# Altium PCB Main_PCB.PcbDoc (part 1 of 2)
Units mil, origin at the board's own origin, x right, y up, seen from the top; angles counter-clockwise.
Board outline 2401.57 x 1732.28 mil, 2 copper layers (Top Layer, Bottom Layer), stack 57 mil thick; 86 components, 54 nets, 243 pads, 73 vias.
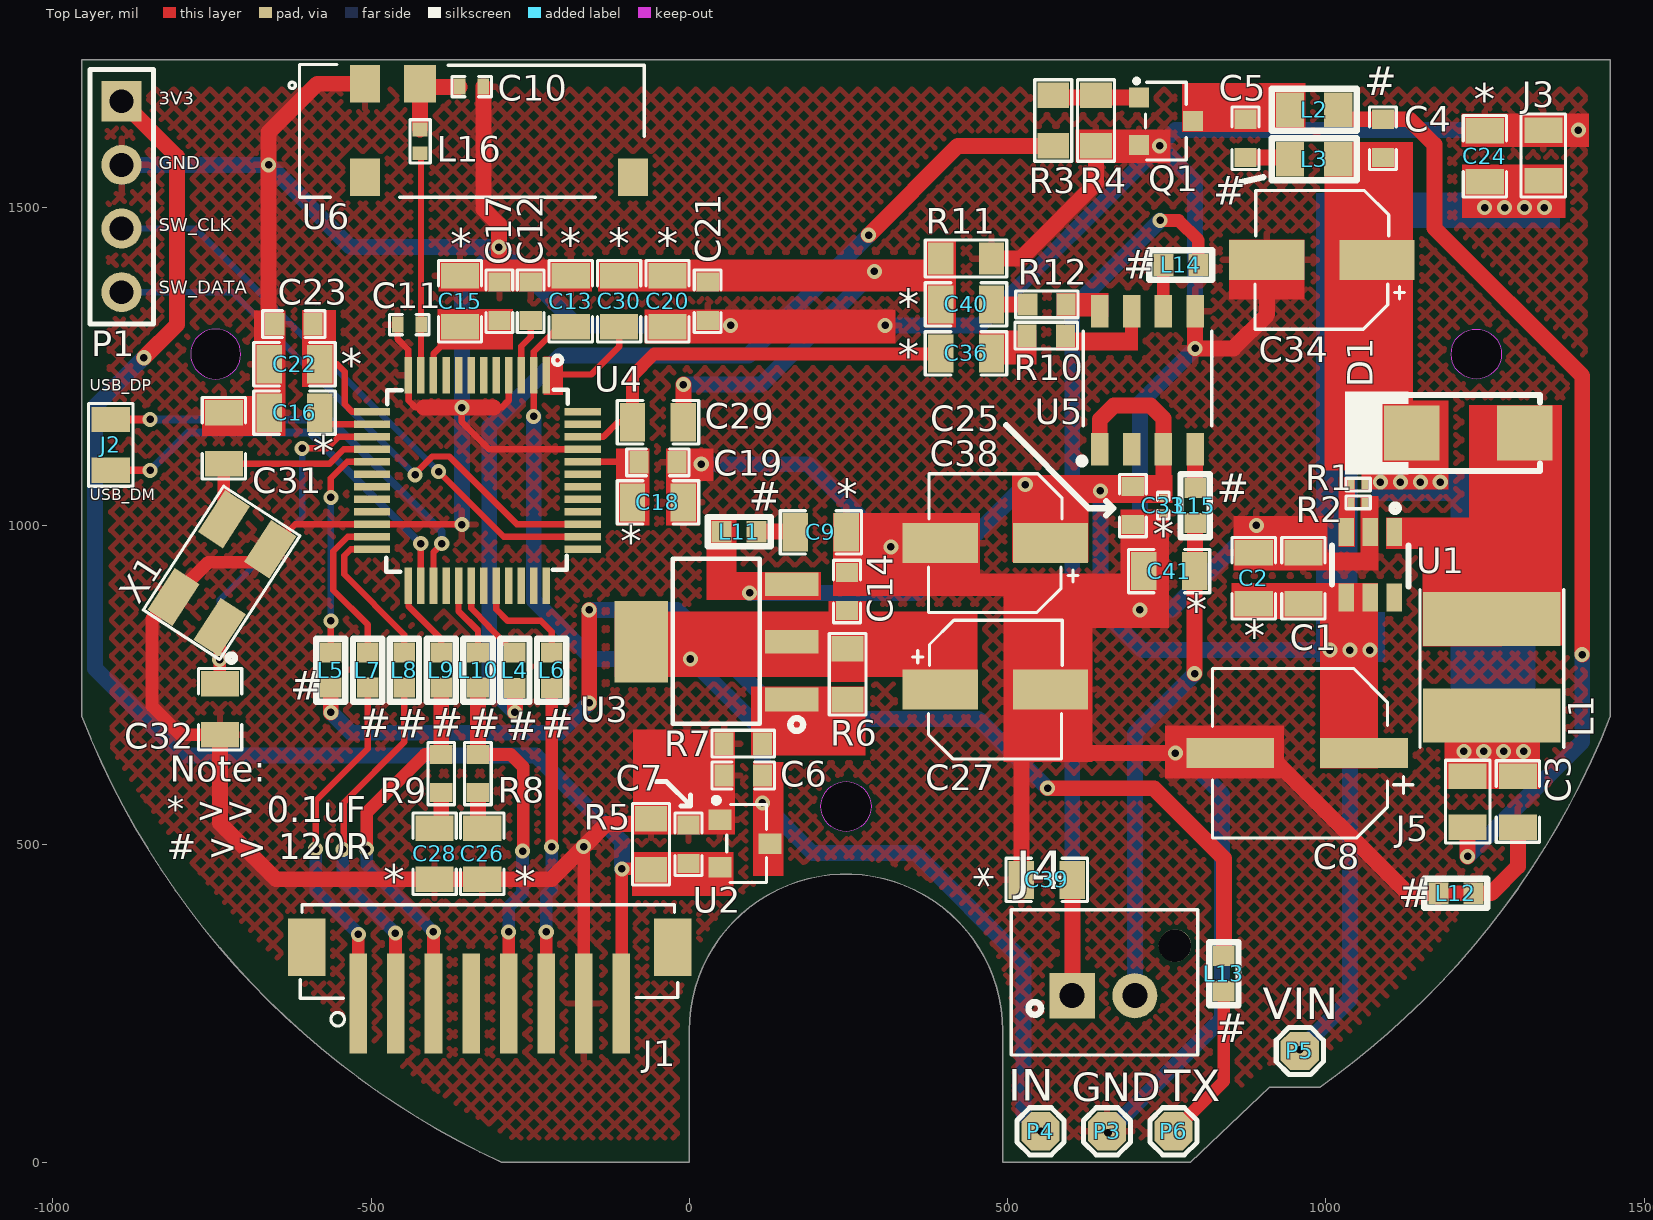
[diagram p0: Top Layer view]
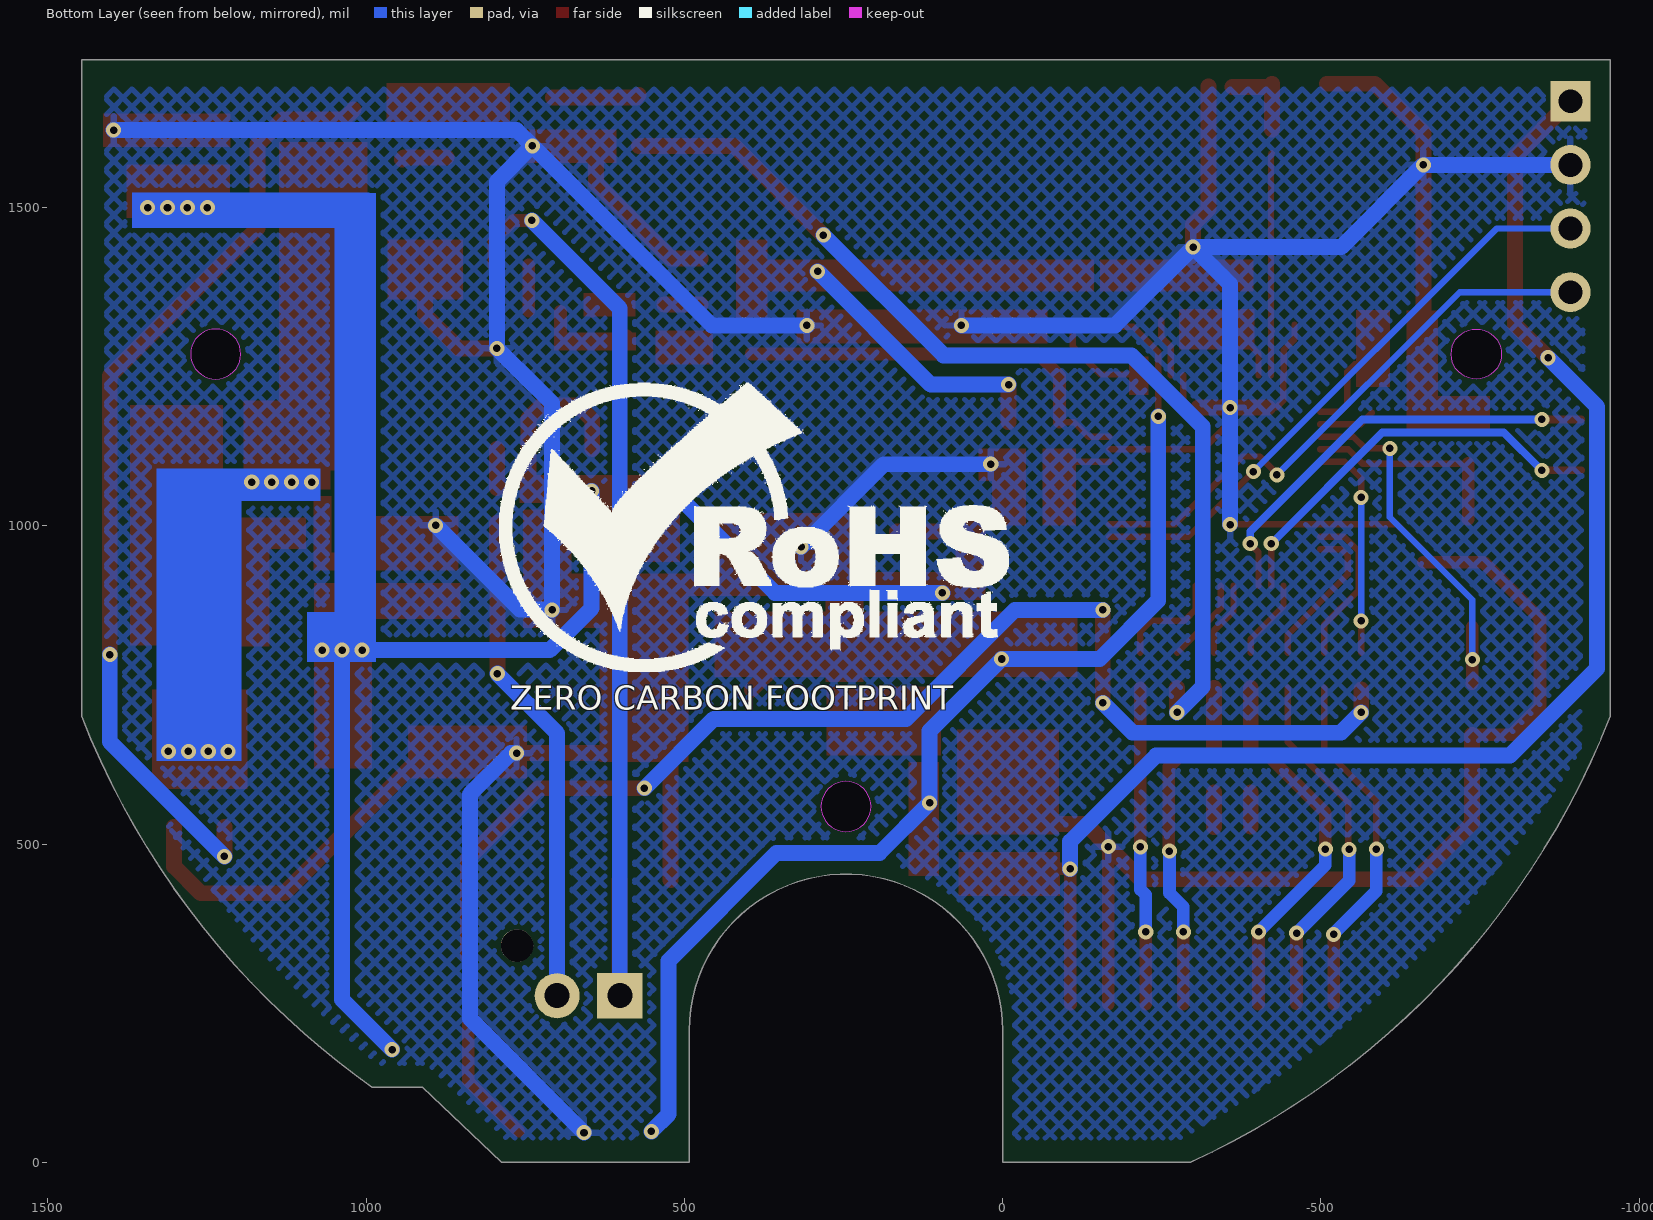
[diagram p1: Bottom Layer view, seen from below]
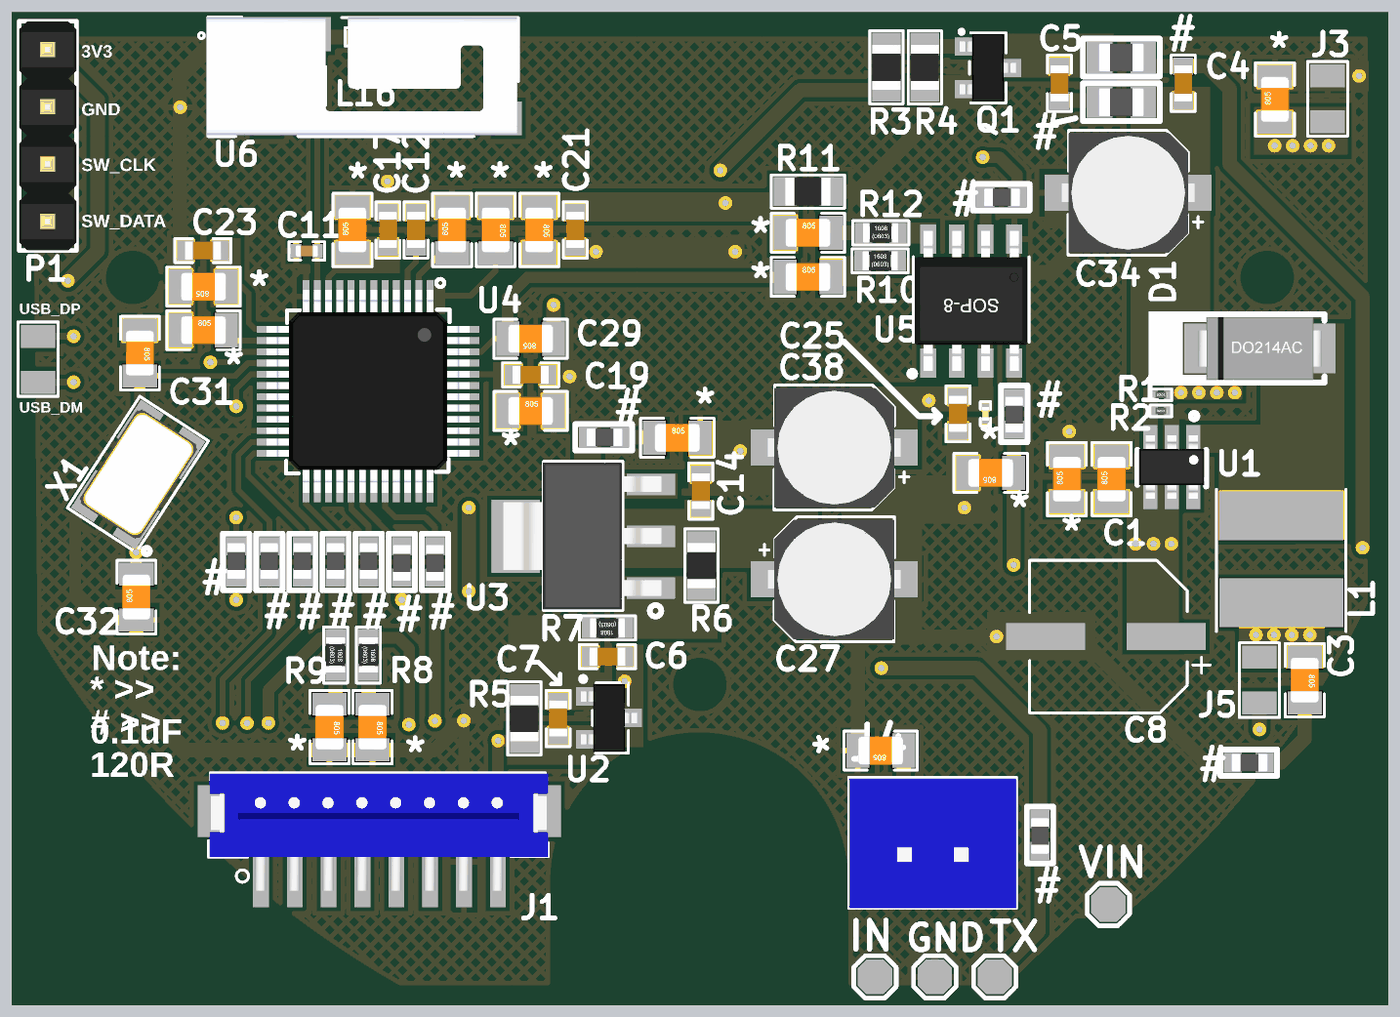
[diagram p2: 3D render of the assembled board from above, using the file's embedded part models]

## Layer stack, top to bottom
Top Solder: solder mask 3, Solder Resist, Dk 3.5
Top Layer: signal copper 10
Dielectric 1: dielectric 37, FR-4, Dk 4.8
Bottom Layer: signal copper 10
Bottom Solder: solder mask 3, Solder Resist, Dk 3.5

## Board outline
1446.85,1732.28 1446.85,700.79 cw(c246.06,1170.45) 1382.68,561.71 cw(c251.62,1167.48) 1096.64,201.97 cw(c236.68,1181.16) 990.52,118.11 911.78,118.11 787.4,0 492.13,0 492.13,206.69 ccw(c246.06,206.69) 0,206.69 0,0 -295.28,0 cw(c245.11,1168.89) -784.46,395.39 cw(c246.06,1170.08) -954.72,700.79 -954.72,1732.28
cut-out: -704.72,1269.69 ccw(c-744.09,1269.69) -744.09,1309.06 ccw(c-744.09,1269.69) -783.46,1269.69 ccw(c-744.09,1269.69) -744.09,1230.31 ccw(c-744.09,1269.69)
cut-out: 246.06,598.43 cw(c246.06,559.06) 285.43,559.06 cw(c246.06,559.06) 246.06,519.69 cw(c246.06,559.06) 206.69,559.06 cw(c246.06,559.06)
cut-out: 1236.22,1309.06 cw(c1236.22,1269.69) 1275.59,1269.69 cw(c1236.22,1269.69) 1236.22,1230.31 cw(c1236.22,1269.69) 1196.85,1269.69 cw(c1236.22,1269.69)

## Design rules (kind name [scope] priority, off if disabled: settings)
Clearance [All] p1: gap=7 ignorepadtopadclearanceinfootprint=FALSE except(0: Arc-Hole Track-Hole SMDPad-Hole THPad-Hole Via-Hole Fill-Hole Poly-Hole Region-Hole Text-Hole)
ComponentClearance [All] p1: gap=0 collisioncheckmode=3 verticalgap=0 showdistances=FALSE
HoleToHoleClearance [All] p1: gap=0 allowstackedmicrovias=TRUE
MinimumSolderMaskSliver [All] p1: minsoldermaskwidth=0
PolygonConnect [All] p1: connectstyle=Relief reliefconductorwidth=10 reliefentries=4 polygonreliefangle="90 Angle" airgapwidth=10
RoutingVias [All] p1: holewidth=11.81 width=23.62 viastyle="Through Hole" minholewidth=7.87 minwidth=17.72 maxholewidth=11.81 maxwidth=23.62
SilkToSilkClearance [All] p1: silktosilkclearance=0
SilkToSolderMaskClearance [IsPad] p1: minsilkscreentomaskgap=0 clearancetoexposedcopper=TRUE
SolderMaskExpansion SolderMaskExpansion_1 [IsVia] p1: expansion=4 istentingtop=FALSE soldermaskfromhole=TRUE
SolderMaskExpansion [Not IsVia] p2: expansion=4 istentingtop=FALSE
Width [All] p1: maxlimit=100 minlimit=10 preferedwidth=10 minimp=50.000000 maximp=50.000000 favimp=50.000000
25 further rules are at their usual default settings.

## Classes and differential pairs
component class U_MCU_Section: C10 C11 C12 C13 C14 C15 C16 C17 C18 C19 C20 C21 C22 C23 C26 C28 C29 C30 C31 C32 L5 L6 L7 L8 L9 L10 L16 R8 R9 U4 U6 X1
component class U_Connector_Section: C9 C24 J1 J2 J3 L11 L12 L13 P1 P3 P4 P5 P6
component class U_Amplifier_Section: C33 C36 C38 C39 C40 C41 J4 L14 L15 R10 R11 R12 U5
component class U_LED_Power_Sheet: C1 C2 C3 C4 C5 C8 C34 D1 J5 L1 L2 L3 L4 Q1 R1 R2 R3 R4 U1
component class U_MCU_Power_Sheet: C6 C7 C25 C27 R5 R6 R7 U2 U3

## Components (designator, comment, footprint, x,y, rotation, side; value= is the part's Value field where it differs from the comment)
C1 "22uF" Cap0805 964.66,917.72 r90 top locked
C2 "0.1uF" Cap0805 886.66,917.72 r90 top locked
C3 "22uF" Cap0805 1301.66,566.72 r270 top
C4 "1uF" Cap0603 1089.66,1608.72 r90 top
C5 "1uF" Cap0603 873.66,1608.72 r90 top
C6 "1uF" Cap0603 84.66,607.72 r180 top
C7 "1uF" Cap0603 -1.34,499.72 r90 top
C8 "220uF" RVT1C221M0607 954.66,642.72 r180 top locked value=Custom
C9 "0.1uF" Cap0805 206.66,989.72 r0 top
C10 "2.7pF" Cap0402 -342,1690 r0 top
C11 "4.7pF" Cap0402 -440,1316 r180 top
C12 "1uF" Cap0603 -249.34,1352.72 r270 top locked
C13 "0.1uF" Cap0805 -186.34,1352.72 r90 top locked
C14 "10uF" Cap0603 247.66,896.72 r90 top
C15 "0.1uF" Cap0805 -360.34,1352.72 r90 top locked
C16 "0.1uF" Cap0805 -620.34,1177.72 r0 top locked
C17 "10uF" Cap0603 -298.34,1352.72 r90 top locked
C18 "0.1uF" Cap0805 -49.34,1036.72 r0 top locked
C19 "10uF" Cap0603 -49.34,1099.72 r0 top locked
C20 "0.1uF" Cap0805 -34.34,1352.72 r270 top locked
C21 "10uF" Cap0603 28.66,1352.72 r270 top locked
C22 "0.1uF" Cap0805 -620.34,1253.72 r180 top locked
C23 "10uF" Cap0603 -621.34,1316.72 r180 top locked
C24 "0.1uF" Cap0805 1249.66,1580.72 r90 top locked
C25 "1uF" Cap0603 696.66,1031.72 r270 top locked
C26 "0.1uF" Cap0805 -325.34,484.72 r270 top locked
C27 "100uF" RVT1A101M0505 480.66,742.72 r0 top locked
C28 "0.1uF" Cap0805 -400.34,484.72 r270 top locked
C29 "0.1uF" Cap0805 -49.34,1162.72 r180 top locked
C30 "0.1uF" Cap0805 -110.34,1352.72 r270 top locked
C31 "20pF" Cap0805 -731.34,1137.72 r270 top locked
C32 "20pF" Cap0805 -737.34,711.72 r90 top locked
C33 "0.1uF" "CAP 0201" 744.66,1031.72 r270 top locked
C34 "100uF" RVT1A101M0505 993.66,1417.72 r180 top locked
C36 "0.1uF" Cap0805 434.66,1270.72 r0 top locked
C38 "100uF" RVT1A101M0505 480.66,972.72 r180 top locked
C39 "0.1uF" Cap0805 561.66,443.72 r180 top
C40 "0.1uF" Cap0805 434.66,1347.72 r0 top locked
C41 "0.1uF" Cap0805 753.66,928.72 r180 top locked
D1 "SS14" DO-214AC 1223.66,1145.72 r0 top
J1 "B8B-ZR-SM4-TF(LF)(SN)" B8B-ZR-SM4-TF(LF)(SN) -313.4,293.71 r0 top locked
J2 "SMD PADS" "SMD PAD" -909,1127 r90 top
J3 "SMD PADS" "SMD PAD" 1341.66,1581.72 r90 top locked
J4 "B2B-XH-AM(LF)(SN)" B2B-XH-AM(LF)(SN) 650.66,261.72 r0 top locked
J5 "SMD PADS" "SMD PAD" 1222.66,566.72 r270 top
L1 "4.7uH" CD54-4R7M 1260.66,777.72 r270 top value=Custom
L2 "BLM21PG121SN1D" BLM21PG121SN1D 981.66,1653.72 r180 top locked
L3 "BLM21PG121SN1D" BLM21PG121SN1D 981.66,1575.72 r180 top locked
L4 "BLM18AG121SN1D" BLM18AG121SN1D -274.18,800.61 r270 top locked
L5 "BLM18AG121SN1D" BLM18AG121SN1D -563.34,745.61 r90 top locked
L6 "BLM18AG121SN1D" BLM18AG121SN1D -216.34,800.61 r270 top locked
L7 "BLM18AG121SN1D" BLM18AG121SN1D -505.51,745.61 r90 top locked
L8 "BLM18AG121SN1D" BLM18AG121SN1D -447.68,745.61 r90 top locked
L9 "BLM18AG121SN1D" BLM18AG121SN1D -389.84,745.61 r90 top locked
L10 "BLM18AG121SN1D" BLM18AG121SN1D -332.01,745.61 r90 top locked
L11 "BLM18AG121SN1D" BLM18AG121SN1D 50.66,990.72 r0 top
L12 "BLM18AG121SN1D" BLM18AG121SN1D 1176.54,422.72 r0 top locked
L13 "BLM18AG121SN1D" BLM18AG121SN1D 839.66,323.84 r270 top
L14 "BLM18AG121SN1D" BLM18AG121SN1D 744.54,1409.72 r0 top locked
L15 "BLM18AG121SN1D" BLM18AG121SN1D 794.66,1059.22 r270 top locked
L16 "1.6nH" "Ind 0402" -423,1604 r270 top
P1 "61300411121" HDR1X4 -892,1667 r270 top
P3 "Test Point" "TEST POINT" 656.16,48.72 r0 top
P4 "Test Point" "TEST POINT" 551.66,48.72 r0 top
P5 "Test Point" "TEST POINT" 959,175 r0 top
P6 "Test Point" "TEST POINT" 760.66,48.72 r0 top
Q1 "ST3422A" SOT23-3 748.66,1635.72 r270 top locked value=Custom
R1 "180K" Res-0201 1050.66,1064.72 r0 top locked
R2 "20K" Res-0201 1050.66,1036.72 r0 top locked
R3 "1K" "RES 0805" 571.66,1636.72 r270 top locked
R4 "10K" "RES 0805" 638.66,1636.72 r270 top locked
R5 "10K" "RES 0805" -60.34,499.72 r270 top
R6 "1K" "RES 0805" 248.66,766.72 r270 top
R7 "1.8K" Res0603 84.66,657.72 r0 top
R8 "10R" Res0603 -332.34,610.72 r90 top locked
R9 "10R" Res0603 -389.84,610.72 r90 top locked
R10 "47K" Res0603 560.66,1298.72 r180 top locked
R11 "0R" "RES 0805" 434.66,1419.72 r180 top locked
R12 "47K" Res0603 561.66,1347.72 r180 top locked
U1 "SDB628" SOT-23-6 1069.66,938.72 r270 top locked value=Custom
U2 "XC6206P332MR-G" sot-23 87.29,500.72 r270 top
U3 "LM1117MPX-ADJ/NOPB" SOT-223 42.66,817.72 r90 top
U4 "BP1048B2" "48 LQFP" -333.11,1071.15 r270 top locked
U5 "HT8693" SOP-8 719.66,1228.72 r90 top locked
U6 "PRO-OB-440" PRO-OB-440 -299,1621 r90 top locked
X1 "24MHz" 7I24000F20UCG -734.34,925.72 r57 top locked

## Footprints (in the part's own frame and the unit in brackets; to place one, negate y for a bottom-side part, rotate by r counter-clockwise, add the part's x,y. Pads: shape width x height; smd on the part's side, far side on the other; paste and mask are expansions set on the pad)
7I24000F20UCG [mm] "24MHz ±20ppm 20pF 40O SMD-5032_4P Crystals RoHS"
  rect 2x1.2 smd: 1(-1.85,-1.1) 2(1.85,-1.1) 3(1.85,1.1) 4(-1.85,1.1)
  silkscreen extent -2.95,-2.3 2.95,1.83, body extent -2.47,-1.6 2.53,1.6, height 1
"48 LQFP" [mm] "7mm x 7mm x 1.4mm, 0.5mm pitch"
  rect 1.45x0.3 smd: 1(-4.202,2.75) 2(-4.202,2.25) 3(-4.202,1.75) 4(-4.202,1.25) 5(-4.202,0.75) 6(-4.202,0.25) 7(-4.202,-0.25) 8(-4.202,-0.75) 9(-4.202,-1.25) 10(-4.202,-1.75) 11(-4.202,-2.25) 12(-4.202,-2.75) 25(4.202,-2.749) 26(4.202,-2.25) 27(4.202,-1.75) 28(4.202,-1.25) 29(4.202,-0.75) 30(4.202,-0.25) 31(4.202,0.25) 32(4.202,0.75) 33(4.202,1.25) 34(4.202,1.75) 35(4.202,2.25) 36(4.202,2.75)
  rect 0.3x1.45 smd: 13(-2.75,-4.202) 14(-2.25,-4.202) 15(-1.75,-4.202) 16(-1.25,-4.202) 17(-0.75,-4.202) 18(-0.25,-4.202) 19(0.25,-4.202) 20(0.75,-4.202) 21(1.25,-4.202) 22(1.75,-4.202) 23(2.25,-4.202) 24(2.75,-4.202) 37(2.75,4.202) 38(2.25,4.202) 39(1.75,4.202) 40(1.25,4.202) 41(0.75,4.202) 42(0.25,4.202) 43(-0.25,4.202) 44(-0.75,4.202) 45(-1.25,4.202) 46(-1.75,4.202) 47(-2.25,4.202) 48(-2.75,4.202)
  silkscreen extent -4.98,-3.64 3.65,3.61, body extent -4.5,-4.5 4.5,4.5, height 1.5
B2B-XH-AM(LF)(SN) [mm] "XH Header Male Pin 0.098\"(2.50mm) 2 Through Hole,P=2.5mm Wire To Board / Wire To Wire Connector RoHS"
  rect 1.8x1.8 hole 1: 1(-1.25,0)
  round 1.8 hole 1: 2(1.25,0)
  round 1.295 hole 1.295 unplated: 3(2.85,2)
  silkscreen extent -3.68,-2.36 3.76,3.43, body extent -3.65,-2.37 3.75,3.38, height 7
B8B-ZR-SM4-TF(LF)(SN) [mm] "ZH Header Male Pin 0.059\"(1.50mm) 8 SMD,P=1.5mm Wire To Board / Wire To Wire Connector RoHS"
  rect 0.7x4 smd: 1(-5.25,-1.125) 2(-3.75,-1.125) 3(-2.25,-1.125) 4(-0.75,-1.125) 5(0.75,-1.125) 6(2.25,-1.125) 7(3.75,-1.125) 8(5.25,-1.125)
  rect 1.5x2.3 smd: MP1(7.3,1.125) MP2(-7.3,1.125)
  silkscreen extent -7.57,-2.02 7.49,2.82, body extent -7.53,-2.41 7.47,2.79, height 5
BLM18AG121SN1D [mm] "120O @ 100MHz 500mA 1 180mO 0603 Ferrite Beads RoHS"
  rect 0.8x0.864 smd: 1(0,0) 2(1.4,0)
  silkscreen extent -0.56,-0.58 1.96,0.58, body extent -0.06,-0.4 1.54,0.4, height 0.95
BLM21PG121SN1D [mil] "120O @ 100MHz 3A 1 30mO 0805 Ferrite Beads RoHS"
  rect 44.61x54.21 smd: 1(-38.03,0) 2(38.03,0)
  silkscreen extent -67,-33 67,33, body extent -39,-25 39,25, height 41
Cap0402 [mil]
  rect 18x25 smd mask+2.36: 1(-18.5,0) 2(18.5,0)
  silkscreen extent -31,-16 31,16, body extent -20,-10 20,10, height 19
Cap0603 [mil]
  rect 30x35 smd mask+2.36: 1(-30,0) 2(30,0)
  silkscreen extent -49,-21 49,21, body extent -32,-16 31,16, height 34
Cap0805 [mil] "SMD 0805"
  rect 40x60 smd mask+2.76: 1(-40,0) 2(40,0)
  silkscreen extent -64,-34 64,34, body extent -39,-25 39,25, height 30
"CAP 0201" [mm]
  rect 0.3x0.3 smd mask+0.055: 1(-0.3,0) 2(0.3,0)
  silkscreen extent -0.53,-0.23 0.53,0.23, body extent -0.3,-0.15 0.3,0.15, height 0.28
CD54-4R7M [mm]
  rect 2.15x5.5 smd mask+0.055: 1(-1.925,0) 2(1.925,0)
  silkscreen extent -3.1,-2.87 3.2,2.87
DO-214AC [mm]
  rect 2.21x2.2 smd: 1(2.25,0) 2(-2.25,0)
  silkscreen extent -4.93,-1.65 2.86,1.65, body extent -2.74,-1.4 2.74,1.4, height 2.24
HDR1X4 [mm] "Connector; Header; 4 Position"
  rect 1.6x1.6 hole 0.95: 1(0,0)
  round 1.6 hole 0.95: 2(2.54,0) 3(5.08,0) 4(7.62,0)
  silkscreen extent -1.27,-1.27 8.89,1.27, body extent -1.27,-1.27 8.89,1.27, height 9.5
"Ind 0402" [mm]
  rect 0.55x0.6 smd: 1(-0.475,0) 2(0.475,0)
  silkscreen extent -0.86,-0.41 0.86,0.41, body extent -0.5,-0.28 0.5,0.27, height 0.48
PRO-OB-440 [mm] "RF ANT 2.4GHZ STAMPED MET SLD"
  rect 1.5x1.2 smd: 1(1.865,5.35) 3(-1.865,5.35) 4(-1.865,-5.35)
  rect 1.5x1.28 smd: 2(1.865,3.15)
  silkscreen extent -2.67,-5.79 2.63,8.38, body extent -2.62,-5.74 2.62,8.01, height 3.5
Res0603 [mil]
  rect 30x35 smd: 1(-30,0) 2(30,0)
  silkscreen extent -49,-21 49,21, body extent -31,-17 31,17, height 18
"RES 0805" [mil] "SMD 0805"
  rect 40x50 smd: 1(-40,0) 2(40,0)
  silkscreen extent -64,-29 64,29, body extent -39,-25 39,24, height 24
Res-0201 [mm]
  rect 0.27x0.37 smd: 1(-0.275,0) 2(0.275,0)
  silkscreen extent -0.48,-0.25 0.48,0.25, body extent -0.3,-0.15 0.3,0.15, height 0.29
RVT1A101M0505 [mm] "100uF ±20% 10V 5mm 5.4mm 2000hrs 105? -45?~+105? SMD,5x5.4mm Aluminum Electrolytic Capacitors - SMD RoHS"
  rect 3x1.6 smd: 1(-2.2,0) 2(2.2,0)
  silkscreen extent -3.3,-2.77 2.67,2.77, body extent -2.95,-2.65 2.95,2.65, height 5.57
RVT1C221M0607 [mm]
  rect 3.5x1.2 smd: 1(-2.67,0) 2(2.67,0)
  silkscreen extent -4.62,-3.38 3.38,3.38
"SMD PAD" [mil] "SMD 0805"
  rect 40x60 smd: 1(-40,0) 2(40,0)
  silkscreen extent -65,-35 65,35
SOP-8 [mm]
  rect 1.3x0.7 smd: 1(-2.75,1.905) 2(-2.75,0.635) 3(-2.75,-0.635) 4(-2.75,-1.905) 5(2.75,-1.905) 6(2.75,-0.635) 7(2.75,0.635) 8(2.75,1.905)
  silkscreen extent -3.36,-2.57 1.96,2.75, body extent -3.11,-2.5 3.11,2.5, height 1.87
SOT23-3 [mm] "SOT23, 3-Leads, Body 2.9x1.3mm, Pitch 0.95mm, Lead Span 2.3mm - Reverse Pinning, IPC High Density"
  rect 0.8x0.8 smd: 1(-0.95,-1.075) 2(0.95,-1.075) 3(0,1.075)
  silkscreen extent -1.65,-1.22 1.55,0.81, body extent -1.5,-1.25 1.5,1.25, height 1.05
sot-23 [mm]
  rect 0.82x0.92 smd: 1(-0.95,-1) 2(0.95,-1) 3(0,1)
  silkscreen extent -1.82,-1.23 1.56,0.86, body extent -1.5,-1.25 1.5,1.25, height 1.1
SOT-23-6 [mm] "IC BAT CHG LI-ION 1 CELL SOT23-6"
  rect 1.12x0.62 smd: 1(-1.3,0.95) 2(-1.3,0) 3(-1.3,-0.95) 4(1.3,-0.95) 5(1.3,0) 6(1.3,0.95)
  silkscreen extent -2.4,-1.52 0.86,1.52, body extent -1.4,-1.45 1.4,1.45, height 1.44
SOT-223 [mm] "Adjustable 18V 1.25V ~ 16.6V 1.4V @ 1A SOT-223 Linear Voltage Regulators (LDO) RoHS"
  rect 0.95x2.15 smd: 1(-2.3,-3.002) 2(0,-3.002) 3(2.3,-3.002)
  rect 3.25x2.15 smd: 4(0,3.002)
  silkscreen extent -3.56,-3.45 3.31,1.75, body extent -3.24,-3.45 3.26,3.55, height 1.54
"TEST POINT" [mil]
  oct 60x60 smd: 1(0,0)
  silkscreen extent -37,-37 37,37

## Part data
C1 C3: library part CL21A226MOQNNNE, "CAP CER 22UF 16V X5R 0805", Case Code (Imperial)=0805, Case Code (Metric)=2012, Dielectric=X5R, Manufacturer=Samsung, Max Operating Temperature=85°C, Min Operating Temperature=-55°C, Package Quantity=1, Supplier Part Number 1=1276-2909-1-ND, Tolerance=20%, Voltage Rating=16V, Capacitance=22uF, Case/Package=0805, Category="Ceramic Capacitors", ComponentLink1Description=https://datasheet.ciiva.com/25724/cl21a226moqnnne-25724832.pdf?src-supplier=Digi-Key, ComponentLink1URL=https://datasheet.ciiva.com/25724/cl21a226moqnnne-25724832.pdf?src-supplier=Digi-Key, Construction=Flat, Contact Plating=Tin, Lead Free="Lead Free", Length=0.079inch, Manufacturer Part Number=CL21A226MOQNNNE, Mount="Surface Mount", Packaging="Cut Tape", Pricing 1="1=0.30000, 10=0.20900, 50=0.13900, 100=0.11820, 500=0.08344, 1000=0.07301 (USD)", RoHS=Yes, RoHS Compliant=Yes, Series=CL, Stock 1=91301, Supplier 1=Digi-Key, Termination=Wraparound, Thickness=0.055inch, Voltage Rating (DC)=16V, Width=0.049inch
C2 C9 C13 C15 C16 C18 C20 C22 C24 C26 C28 C29 C30 C36 C39 C40 C41: library part 0805B104K500CT, "CAP CER 0.1UF 50V X7R 0805", Capacitance=100nF, Case Code (Imperial)=0805, Case Code (Metric)=2012, Dielectric=X7R, Manufacturer="Walsin Technologies", Max Operating Temperature=125°C, Min Operating Temperature=-55°C, Supplier Part Number 1=1292-1647-1-ND, Tolerance=10%, Voltage=50V, Case/Package=0805, Category="Ceramic Capacitors", ComponentLink1Description=http://www.farnell.com/datasheets/2340522.pdf?src-supplier=Farnell, ComponentLink1URL=http://www.farnell.com/datasheets/2340522.pdf?src-supplier=Farnell, ComponentLink2Description=http://components.arrow.com/part/dataview/0323_00650840?src-supplier=Arrow+Europe, ComponentLink2URL=http://components.arrow.com/part/dataview/0323_00650840?src-supplier=Arrow+Europe, ComponentLink3Description=https://www.verical.com/server-webapp/html/getDatasheet?partID=414849&src-supplier=Verical, ComponentLink3URL=https://www.verical.com/server-webapp/html/getDatasheet?partID=414849&src-supplier=Verical, ComponentLink4Description=http://www.farnell.com/datasheets/2340522.pdf?src-supplier=Element14, ComponentLink4URL=http://www.farnell.com/datasheets/2340522.pdf?src-supplier=Element14, ComponentLink5Description=http://www.passivecomponent.com/wp-content/uploads/2018/10/MLCC.pdf?src-supplier=Digi-Key, ComponentLink5URL=http://www.passivecomponent.com/wp-content/uploads/2018/10/MLCC.pdf?src-supplier=Digi-Key, ComponentLink6Description=http://www.passivecomponent.com/indexsea/0805B104K500CT-IB.pdf?src-supplier=Digi-Key, ComponentLink6URL=http://www.passivecomponent.com/indexsea/0805B104K500CT-IB.pdf?src-supplier=Digi-Key, ComponentLink7Description=http://www.farnell.com/datasheets/2340522.pdf?src-supplier=Newark, ComponentLink7URL=http://www.farnell.com/datasheets/2340522.pdf?src-supplier=Newark, Depth=1.25mm, Lead Free="Lead Free", Length=2mm, Manufacturer Part Number=0805B104K500CT, Packaging="Tape and Reel", Pricing 1="1=0.12000, 10=0.08600, 50=0.04900, 100=0.04050, 500=0.02842, 1000=0.02352 (USD)", Radiation Hardening=No, REACH SVHC=Unknown, RoHS=Yes, Stock 1=1274242, Supplier 1=Digi-Key, Voltage Rating=50V, Voltage Rating (DC)=50V
C4 C5 C6 C7 C12 C25: library part CC0603KRX5R8BB105, "CAP CER 1UF 25V X5R 0603", Case Code (Imperial)=0603, Case Code (Metric)=1608, Dielectric=X5R, Manufacturer=Yageo, Max Operating Temperature=85°C, Min Operating Temperature=-55°C, Package Quantity=1, Supplier Part Number 1=311-1445-1-ND, Tolerance=10%, Voltage Rating=25V, Capacitance=1uF, Case/Package=0603, Category="Ceramic Capacitors", ComponentLink1Description=https://datasheet.ciiva.com/176/mlccorderingcode-176785.pdf?src-supplier=Digi-Key, ComponentLink1URL=https://datasheet.ciiva.com/176/mlccorderingcode-176785.pdf?src-supplier=Digi-Key, ComponentLink2Description=https://datasheet.ciiva.com/176/mlccorderingcode-176786.pdf?src-supplier=Digi-Key, ComponentLink2URL=https://datasheet.ciiva.com/176/mlccorderingcode-176786.pdf?src-supplier=Digi-Key, ComponentLink3Description=https://datasheet.ciiva.com/176/mlccorderingcode-176787.pdf?src-supplier=Digi-Key, ComponentLink3URL=https://datasheet.ciiva.com/176/mlccorderingcode-176787.pdf?src-supplier=Digi-Key, ComponentLink4Description=https://datasheet.ciiva.com/17436/upy-gphc-x5r-4v-to-50v-12-17436952.pdf?src-supplier=Avnet+Europe, ComponentLink4URL=https://datasheet.ciiva.com/17436/upy-gphc-x5r-4v-to-50v-12-17436952.pdf?src-supplier=Avnet+Europe, ComponentLink5Description=https://datasheet.ciiva.com/7978/1525783-7978171.pdf?src-supplier=Element14, ComponentLink5URL=https://datasheet.ciiva.com/7978/1525783-7978171.pdf?src-supplier=Element14, ComponentLink6Description=https://datasheet.ciiva.com/11586/upy-gphc-x5r-4v-to-50v-12-11586318.pdf?src-supplier=Avnet, ComponentLink6URL=https://datasheet.ciiva.com/11586/upy-gphc-x5r-4v-to-50v-12-11586318.pdf?src-supplier=Avnet, Construction=Flat, Depth=0.8mm, Halogen Free="Halogen Free", Height=0.8mm, Lead Free="Lead Free", Length=1.6mm, Manufacturer Part Number=CC0603KRX5R8BB105, Mount="Surface Mount", Number of Pins=2, Packaging="Tape and Reel", Pricing 1="1=0.12000, 10=0.08400, 50=0.04760, 100=0.03940, 500=0.02764, 1000=0.02288 (USD)", Radiation Hardening=No, REACH SVHC="No SVHC", RoHS=Yes, RoHS Compliant=Yes, Series=CC, Stock 1=919939, Supplier 1=Digi-Key, Termination=SMD/SMT, Thickness=0.035inch, Voltage Rating (DC)=25V, Width=0.031inch
C8: library part RVT1C221M0607, "220uF 16V 6.3mm 7.7mm 2000hrs 105℃ -55℃~+105℃ SMD,6.3x7.7mm Aluminum Electrolytic Capacitors - SMD RoHS", Manufacturer="Honor Elec", Package=Custom, ComponentLink1Description="Supplier Link", ComponentLink1URL=https://lcsc.com/product-detail/Aluminum-Electrolytic-Capacitors-SMD_Honor-Elec-RVT1C221M0607_C3342.html, Manufacturer Part No=RVT1C221M0607
C10: library part 04023A2R7BAT2A, "CAP CER 2.7PF 25V NP0 0402", Case Code (Imperial)=0402, Case Code (Metric)=1005, Dielectric=C0G, Manufacturer="Kyocera AVX", Max Operating Temperature=125°C, Min Operating Temperature=-55°C, Package Quantity=10000, Supplier Part Number 1=478-12612-6-ND, Temperature Coefficient=0ppm/°C, Voltage Rating=25V, Capacitance=2.7pF, Case/Package=0402, ComponentLink1Description=http://datasheets.avx.com/C0GNP0-Dielectric.pdf?src-supplier=Digi-Key, ComponentLink1URL=http://datasheets.avx.com/C0GNP0-Dielectric.pdf?src-supplier=Digi-Key, ComponentLink2Description=http://www.avx.com/docs/Catalogs/ccog.pdf?src-supplier=Future+Electronics, ComponentLink2URL=http://www.avx.com/docs/Catalogs/ccog.pdf?src-supplier=Future+Electronics, ComponentLink3Description=http://www.avxcorp.com/docs/Catalogs/ccog.pdf?src-supplier=Avnet, ComponentLink3URL=http://www.avxcorp.com/docs/Catalogs/ccog.pdf?src-supplier=Avnet, Depth=0.5mm, Lead Free="Lead Free", Length=1mm, Manufacturer Part Number=04023A2R7BAT2A, Mount="Surface Mount", Packaging="Tape and Reel", Pricing 1="1=0.32, 10=0.218, 50=0.1452, 100=0.1234, 500=0.08712, 1000=0.07623, 2500=0.0726, 5000=0.06716 (USD)", Radiation Hardening=No, Stock 1=28479, Supplier 1=Digi-Key, Termination=SMD/SMT, Thickness=0.022inch, Voltage Rating (DC)=25V, Width=0.02inch
C11: library part 885012005023, "CAP CER 4.7PF 16V C0G/NP0 0402", Case Code (Imperial)=0402, Case Code (Metric)=1005, Manufacturer="Wurth Electronics", Max Operating Temperature=125°C, Min Operating Temperature=-55°C, Supplier Part Number 1=732-7439-6-ND, Voltage Rating=16V, Capacitance=4.7pF, Case/Package=0402, ComponentLink1Description=https://katalog.we-online.de/pbs/datasheet/885012005023.pdf?src-supplier=Digi-Key, ComponentLink1URL=https://katalog.we-online.de/pbs/datasheet/885012005023.pdf?src-supplier=Digi-Key, ComponentLink2Description=http://www.farnell.com/datasheets/2546554.pdf?src-supplier=Farnell, ComponentLink2URL=http://www.farnell.com/datasheets/2546554.pdf?src-supplier=Farnell, ComponentLink3Description=http://www.farnell.com/datasheets/2546554.pdf?src-supplier=Newark, ComponentLink3URL=http://www.farnell.com/datasheets/2546554.pdf?src-supplier=Newark, ComponentLink4Description=http://www.farnell.com/datasheets/2546554.pdf?src-supplier=Element14, ComponentLink4URL=http://www.farnell.com/datasheets/2546554.pdf?src-supplier=Element14, Length=0.039inch, Manufacturer Part Number=885012005023, Mount="Surface Mount", Packaging="Cut Tape", Pricing 1="1=0.1, 10=0.015, 100=0.0134, 500=0.01188 (USD)", Stock 1=8921, Supplier 1=Digi-Key, Thickness=0.022inch, Width=0.02inch
C14 C17 C19 C21 C23: library part C1608X5R1E106M080AC, "CAP CER 10UF 25V X5R 0603", Case Code (Imperial)=0603, Case Code (Metric)=1608, Dielectric=X5R, Dielectric Material=Ceramic, Manufacturer=TDK, Max Operating Temperature=85°C, Min Operating Temperature=-55°C, Package Quantity=1, Supplier Part Number 1=445-9015-1-ND, Tolerance=20%, Voltage Rating=25V, Capacitance=10uF, Case/Package=0603, Category="Ceramic Capacitors", ComponentLink1Description=http://components.arrow.com/part/dataview/0323_06887183?src-supplier=Arrow+Europe, ComponentLink1URL=http://components.arrow.com/part/dataview/0323_06887183?src-supplier=Arrow+Europe, ComponentLink2Description=http://www.farnell.com/datasheets/2792994.pdf?src-supplier=Farnell, ComponentLink2URL=http://www.farnell.com/datasheets/2792994.pdf?src-supplier=Farnell, ComponentLink3Description=http://www.farnell.com/datasheets/2291921.pdf?src-supplier=Avnet, ComponentLink3URL=http://www.farnell.com/datasheets/2291921.pdf?src-supplier=Avnet, ComponentLink4Description=http://www.farnell.com/datasheets/1470445.pdf?src-supplier=Newark, ComponentLink4URL=http://www.farnell.com/datasheets/1470445.pdf?src-supplier=Newark, ComponentLink5Description=http://www.farnell.com/datasheets/2291921.pdf?src-supplier=Newark, ComponentLink5URL=http://www.farnell.com/datasheets/2291921.pdf?src-supplier=Newark, ComponentLink6Description=http://www.farnell.com/datasheets/2792994.pdf?src-supplier=Element14, ComponentLink6URL=http://www.farnell.com/datasheets/2792994.pdf?src-supplier=Element14, ComponentLink7Description=http://www.farnell.com/datasheets/1913358.pdf?src-supplier=Element14, ComponentLink7URL=http://www.farnell.com/datasheets/1913358.pdf?src-supplier=Element14, ComponentLink8Description=https://product.tdk.com/info/en/catalog/datasheets/mlcc_commercial_general_en.pdf?src-supplier=Digi-Key, ComponentLink8URL=https://product.tdk.com/info/en/catalog/datasheets/mlcc_commercial_general_en.pdf?src-supplier=Digi-Key, ComponentLink9Description=http://www.farnell.com/datasheets/2291921.pdf?src-supplier=RSComponents, ComponentLink9URL=http://www.farnell.com/datasheets/2291921.pdf?src-supplier=RSComponents, ComponentLink10Description=http://www.farnell.com/datasheets/2291921.pdf?src-supplier=Verical, ComponentLink10URL=http://www.farnell.com/datasheets/2291921.pdf?src-supplier=Verical, ComponentLink11Description=http://www.farnell.com/datasheets/2291921.pdf?src-supplier=Mouser, ComponentLink11URL=http://www.farnell.com/datasheets/2291921.pdf?src-supplier=Mouser, ComponentLink12Description=http://www.farnell.com/datasheets/2792994.pdf?src-supplier=Newark, ComponentLink12URL=http://www.farnell.com/datasheets/2792994.pdf?src-supplier=Newark, ComponentLink13Description=http://www.farnell.com/datasheets/2291921.pdf?src-supplier=Quest, ComponentLink13URL=http://www.farnell.com/datasheets/2291921.pdf?src-supplier=Quest, ComponentLink14Description=http://www.farnell.com/datasheets/2291921.pdf?src-supplier=TTI, ComponentLink14URL=http://www.farnell.com/datasheets/2291921.pdf?src-supplier=TTI, Construction=Flat, Depth=0.8mm, Height=0.8mm, Lead Free="Lead Free", Length=1.6mm, Manufacturer Part Number=C1608X5R1E106M080AC, Mount="Surface Mount", Packaging="Tape and Reel", Pricing 1="1=0.86000, 10=0.60700, 50=0.45920, 100=0.39990, 500=0.29624, 1000=0.25180 (USD)", REACH SVHC="No SVHC", Resistor Type=Ceramic, RoHS=Yes, RoHS Compliant=Yes, Series=C, Stock 1=217631, Supplier 1=Digi-Key, Termination=SMD/SMT, Thickness=0.039inch, Voltage Rating (DC)=25V, Weight=7.1E-05oz, Width=0.8mm
C27 C34 C38: library part RVT1A101M0505, "100uF ±20% 10V 5mm 5.4mm 2000hrs 105℃ -45℃~+105℃ SMD,5x5.4mm Aluminum Electrolytic Capacitors - SMD RoHS", Manufacturer="CX(Dongguan Chengxing Elec)", Operating Temperature=-45℃~+105℃, Package=SMD,5x5.4mm, Rated Voltage=10V, Tolerance=±20%, Capacitance=100uF, L=5.4mm, φD=5mm
C31 C32: library part C0805C200J5GACTU, "CAP CER 20PF 50V C0G/NP0 0805", Case Code (Imperial)=0805, Case Code (Metric)=2012, Dielectric=C0G, Dielectric Material=Ceramic, Manufacturer=KEMET, Max Operating Temperature=125°C, Min Operating Temperature=-55°C, Package Quantity=4000, Supplier Part Number 1=399-8033-1-ND, Tolerance=5%, Voltage Rating=50V, Capacitance=20pF, Case/Package=0805, Category="Ceramic Capacitors", ComponentLink1Description=https://datasheet.ciiva.com/5414/kem-c1003-c0g-smd-356956-5414200.pdf?src-supplier=Mouser, ComponentLink1URL=https://datasheet.ciiva.com/5414/kem-c1003-c0g-smd-356956-5414200.pdf?src-supplier=Mouser, Construction=Flat, Contact Plating=Tin,Matte, Depth=1.25mm, Dissipation Factor=0.1%, Height=0.78mm, Lead Free="Lead Free", Lead Pitch=0.75mm, Length=2mm, Manufacturer Part Number=C0805C200J5GACTU, Mount="Surface Mount", Packaging="Tape and Reel", Pricing 1="1=0.30000, 10=0.20700, 50=0.13800, 100=0.11730, 500=0.08280, 1000=0.07245 (USD)", Radiation Hardening=No, REACH SVHC="No SVHC", RoHS=Yes, RoHS Compliant=Yes, Series="SMD Comm C0G", Stock 1=17196, Supplier 1=Digi-Key, Termination=SMD/SMT, Thickness=0.035inch, Voltage Rating (DC)=50V, Width=1.2mm
C33: library part GRM033R6YA104ME14D, "CAP CER 0.1UF 35V X5R 0201", Capacitance=100nF, Case Code (Imperial)=0201, Case Code (Metric)=0603, Dielectric=X5R, Manufacturer=Murata, Max Operating Temperature=85°C, Min Operating Temperature=-55°C, Package Quantity=15000, Supplier Part Number 1=490-10431-1-ND, Tolerance=20%, Voltage Rating=35V, Case/Package=0201, Category="Ceramic Capacitors", ComponentLink1Description=http://www.mouser.com/ds/2/281/c02e-2905.pdf?src-supplier=Mouser, ComponentLink1URL=http://www.mouser.com/ds/2/281/c02e-2905.pdf?src-supplier=Mouser, ComponentLink2Description=http://search.murata.co.jp/Ceramy/image/img/A01X/G101/ENG/GRM033R6YA104ME14-01.pdf?src-supplier=Digi-Key, ComponentLink2URL=http://search.murata.co.jp/Ceramy/image/img/A01X/G101/ENG/GRM033R6YA104ME14-01.pdf?src-supplier=Digi-Key, Height=0.3mm, Length=0.024inch, Manufacturer Part Number=GRM033R6YA104ME14D, Mount="Surface Mount", Packaging="Tape and Reel", Pricing 1="1=0.10000, 10=0.05600, 50=0.03040, 100=0.02490, 500=0.01778, 1000=0.01398, 2500=0.01270, 5000=0.01169 (USD)", RoHS=Yes, Stock 1=49800, Supplier 1=Digi-Key, Termination=SMD/SMT, Thickness=0.013inch, Voltage Rating (DC)=35V, Weight=1.2E-05oz, Width=0.012inch
D1: "DIODE SCHOTTKY 40V 1A SMA", Average Rectified Current=1A, Case/Package=DO-214AC, Forward Voltage=500mV, Manufacturer="ON Semiconductor / Fairchild", Max Forward Surge Current (Ifsm)=40A, Max Operating Temperature=125°C, Max Power Dissipation=1.1W, Max Repetitive Reverse Voltage (Vrrm)=40V, Max Reverse Current=200uA, Min Operating Temperature=-65°C, Package Quantity=7500, Supplier Part Number 1=5716527, Category="Schottky Diodes", Current=1A, Current Rating=1A, Element Configuration=Single, Forward Current=1A, Height=2.2mm, Lead Free="Lead Free", Length=4.75mm, Manufacturer Part Number=SS14, Max Reverse Voltage (DC)=40V, Mount="Surface Mount", Number of Elements=1, Number of Pins=2, Number of Terminals/Pins=2, Output Current=1A, Packaging="Tape and Reel", Peak Non-Repetitive Surge Current=40A, Polarity=Standard, Power Dissipation=1.1W, Pricing 1="7500=0.18400, 15000=0.14900, 22500=0.14800, 30000=0.14700 (USD)", Radiation Hardening=No, REACH SVHC="No SVHC", RoHS=Yes, RoHS Compliant=Yes, Series=-, Stock 1=52500, Supplier 1="Future Electronics", Termination=SMD/SMT, Voltage=40V, Voltage Rating (DC)=40V, Weight=0.003739oz, Width=2.95mm
J1: "Conn Shrouded Header HDR 8 POS 1.5mm Solder ST SMD T/R", Color=Natural, Contact Resistance=30mR, Current Rating=1A, Housing Color=Beige, Manufacturer=JST, Max Operating Temperature=85°C, Max Voltage Rating (AC)=50V, Min Operating Temperature=-25°C, Supplier Part Number 1=455-1687-1-ND, Category="Board to Board Connectors", ComponentLink1Description=https://datasheet.ciiva.com/26894/getdatasheetpartid-640747-26894507.pdf?src-supplier=Verical, ComponentLink1URL=https://datasheet.ciiva.com/26894/getdatasheetpartid-640747-26894507.pdf?src-supplier=Verical, ComponentLink2Description=https://datasheet.ciiva.com/16418/ezr-16418253.pdf?src-supplier=Future+Electronics, ComponentLink2URL=https://datasheet.ciiva.com/16418/ezr-16418253.pdf?src-supplier=Future+Electronics, Connector Type="Male Pin", Contact Material=Tin,Brass, Contact Plating=Tin,Copper, Depth=6.5mm, Fastening Type=Detent, Gender=Male, Height=7.2mm, Housing Material=Polyamide, Lead Free="Lead Free", Length=15mm, Manufacturer Part Number=B8B-ZR-SM4-TF(LF)(SN), Max Current Rating=1A, Mount="Surface Mount", Number of Contacts=8, Number of Positions=8, Number of Rows=1, Orientation="Right Angle", Packaging="Tape and Reel", Pitch=1.5mm, Pricing 1="1=0.80000, 10=0.70700, 100=0.60970, 500=0.49886 (USD)", RoHS=Yes, Supplier 1=Digi-Key, Termination=Solder, Width=3.5mm
J2 J3 J5: library part "SMD PAD"
J4: "XH Header Male Pin 0.098\"(2.50mm) 2 Through Hole,P=2.5mm Wire To Board / Wire To Wire Connector RoHS", Manufacturer="JST Sales America", Connector Type=Header, Contact Type="Male Pin", Number of Positions=2, Number of Rows=1, Pitch="0.098\"(2.50mm)", Series=XH
L1: library part CD54-4R7M, "SMD Power Inductors RoHS", Manufacturer=DMBJ, Package=Custom, ComponentLink1Description="Supplier Link", ComponentLink1URL=https://lcsc.com/product-detail/Power-Inductors_DMBJ-CD54-4R7M_C2826660.html, Manufacturer Part No=CD54-4R7M
L2 L3: "Ferrite Bead 120 ohm, 3 A, 0805", Case Code (Imperial)=0805, Case Code (Metric)=2012, Current Rating=3A, DC Resistance (DCR)=30mR, Manufacturer=Murata, Max Operating Temperature=125°C, Min Operating Temperature=-55°C, Package Quantity=1, Supplier Part Number 1=490-5986-1-ND, Test Frequency=100MHz, Tolerance=25%, Case/Package=0805, Category="Ferrite Beads and Chips", ComponentLink1Description=https://datasheet.ciiva.com/1012/l0110s0100blm18p-1012160.pdf?src-supplier=Digi-Key, ComponentLink1URL=https://datasheet.ciiva.com/1012/l0110s0100blm18p-1012160.pdf?src-supplier=Digi-Key, ComponentLink2Description=https://datasheet.ciiva.com/8021/5148-8021488.pdf?src-supplier=Element14, ComponentLink2URL=https://datasheet.ciiva.com/8021/5148-8021488.pdf?src-supplier=Element14, ComponentLink3Description=https://datasheet.ciiva.com/11799/0900766b81275ca5-11799524.pdf?src-supplier=RSComponents, ComponentLink3URL=https://datasheet.ciiva.com/11799/0900766b81275ca5-11799524.pdf?src-supplier=RSComponents, ComponentLink4Description=https://datasheet.ciiva.com/19458/1845056-19458409.pdf?src-supplier=Jameco, ComponentLink4URL=https://datasheet.ciiva.com/19458/1845056-19458409.pdf?src-supplier=Jameco, ComponentLink5Description=https://datasheet.ciiva.com/3081/l0110s0100blm18p-3081637.pdf?src-supplier=Avnet, ComponentLink5URL=https://datasheet.ciiva.com/3081/l0110s0100blm18p-3081637.pdf?src-supplier=Avnet, ComponentLink6Description=https://datasheet.ciiva.com/16420/l0110s0100blm18p-16420745.pdf?src-supplier=Future+Electronics, ComponentLink6URL=https://datasheet.ciiva.com/16420/l0110s0100blm18p-16420745.pdf?src-supplier=Future+Electronics, ComponentLink7Description=https://datasheet.ciiva.com/1012/l0110s0100blm18p-1012158.pdf?src-supplier=Digi-Key, ComponentLink7URL=https://datasheet.ciiva.com/1012/l0110s0100blm18p-1012158.pdf?src-supplier=Digi-Key, ComponentLink8Description=https://datasheet.ciiva.com/1012/l0110s0100blm18p-1012159.pdf?src-supplier=Digi-Key, ComponentLink8URL=https://datasheet.ciiva.com/1012/l0110s0100blm18p-1012159.pdf?src-supplier=Digi-Key, ComponentLink9Description=https://datasheet.ciiva.com/16420/l0110s0100blm21p-16420725.pdf?src-supplier=Future+Electronics, ComponentLink9URL=https://datasheet.ciiva.com/16420/l0110s0100blm21p-16420725.pdf?src-supplier=Future+Electronics, ComponentLink10Description=https://datasheet.ciiva.com/6211/l0110s0100blm21p-6211734.pdf?src-supplier=Digi-Key, ComponentLink10URL=https://datasheet.ciiva.com/6211/l0110s0100blm21p-6211734.pdf?src-supplier=Digi-Key, ComponentLink11Description=https://datasheet.ciiva.com/6211/l0110s0100blm21p-6211738.pdf?src-supplier=Digi-Key, ComponentLink11URL=https://datasheet.ciiva.com/6211/l0110s0100blm21p-6211738.pdf?src-supplier=Digi-Key, ComponentLink12Description=https://datasheet.ciiva.com/6211/l0110s0100blm21p-6211739.pdf?src-supplier=Digi-Key, ComponentLink12URL=https://datasheet.ciiva.com/6211/l0110s0100blm21p-6211739.pdf?src-supplier=Digi-Key, ComponentLink13Description=https://datasheet.ciiva.com/46423/1756152-46423915.pdf?src-supplier=Element14, ComponentLink13URL=https://datasheet.ciiva.com/46423/1756152-46423915.pdf?src-supplier=Element14, DC Resistance-Max=30mR, Depth=1.25mm, Height=0.85mm, Impedance=120R, Lead Free="Lead Free", Length=2mm, Manufacturer Part Number=BLM21PG121SN1D, Material=Steel,Ferrite, Max Current Rating=3A, Max DC Current=3A, Number of Circuits=1, Number of Lines=1, Number of Pins=2, Packaging="Tape and Reel", Pricing 1="1=0.13000, 10=0.10300, 25=0.09320, 50=0.06820, 100=0.05890, 250=0.04652, 500=0.03930, 1000=0.03309 (USD)", REACH SVHC="No SVHC", RoHS=Yes, RoHS Compliant=Yes, Series=BLM21P, Stock 1=1370, Supplier 1=Digi-Key, Termination=SMD/SMT, Width=1.25mm
L4 L5 L6 L7 L8 L9 L10 L11 L12 L13 L14 L15: "Ferrite Beads 120Ohm 25% 500mA 0603", Case Code (Imperial)=0603, Case Code (Metric)=1608, Current Rating=500mA, DC Resistance (DCR)=180mR, Frequency=100MHz, Manufacturer=Murata, Max Operating Temperature=125°C, Min Operating Temperature=-55°C, Package Quantity=1, Supplier Part Number 1=490-1011-1-ND, Tolerance=25%, Case/Package=0603, Category=Inductors, ComponentLink1Description=https://datasheet.ciiva.com/11795/0900766b811b5866-11795382.pdf?src-supplier=RSComponents, ComponentLink1URL=https://datasheet.ciiva.com/11795/0900766b811b5866-11795382.pdf?src-supplier=RSComponents, ComponentLink2Description=https://datasheet.ciiva.com/19460/1844723-19460204.pdf?src-supplier=Jameco, ComponentLink2URL=https://datasheet.ciiva.com/19460/1844723-19460204.pdf?src-supplier=Jameco, ComponentLink3Description=https://datasheet.ciiva.com/29347/442268-da-01-en-chip-drossel-0603-120r-500ma-1-6x0-8mm-29347890.pdf?src-supplier=Conrad, ComponentLink3URL=https://datasheet.ciiva.com/29347/442268-da-01-en-chip-drossel-0603-120r-500ma-1-6x0-8mm-29347890.pdf?src-supplier=Conrad, ComponentLink4Description=https://datasheet.ciiva.com/41449/001172222-da-01-en-drossel-0603-120r-1-6x0-8mm-4000st-41449509.pdf?src-supplier=Conrad, ComponentLink4URL=https://datasheet.ciiva.com/41449/001172222-da-01-en-drossel-0603-120r-1-6x0-8mm-4000st-41449509.pdf?src-supplier=Conrad, ComponentLink5Description=https://datasheet.ciiva.com/14122/blm-series-eng-tds-14122902.pdf?src-supplier=Distrelec, ComponentLink5URL=https://datasheet.ciiva.com/14122/blm-series-eng-tds-14122902.pdf?src-supplier=Distrelec, ComponentLink6Description=https://datasheet.ciiva.com/17246/l0110s0100blm18a-17246919.pdf?src-supplier=Avnet+Europe, ComponentLink6URL=https://datasheet.ciiva.com/17246/l0110s0100blm18a-17246919.pdf?src-supplier=Avnet+Europe, ComponentLink7Description=https://datasheet.ciiva.com/3081/l0110s0100blm18a-3081610.pdf?src-supplier=Avnet, ComponentLink7URL=https://datasheet.ciiva.com/3081/l0110s0100blm18a-3081610.pdf?src-supplier=Avnet, ComponentLink8Description=https://datasheet.ciiva.com/1012/l0110s0100blm18a-1012011.pdf?src-supplier=Digi-Key, ComponentLink8URL=https://datasheet.ciiva.com/1012/l0110s0100blm18a-1012011.pdf?src-supplier=Digi-Key, ComponentLink9Description=https://datasheet.ciiva.com/1012/l0110s0100blm18a-1012012.pdf?src-supplier=Digi-Key, ComponentLink9URL=https://datasheet.ciiva.com/1012/l0110s0100blm18a-1012012.pdf?src-supplier=Digi-Key, ComponentLink10Description=https://datasheet.ciiva.com/8510/l0110s0100blm18a-8510156.pdf?src-supplier=Avnet, ComponentLink10URL=https://datasheet.ciiva.com/8510/l0110s0100blm18a-8510156.pdf?src-supplier=Avnet, ComponentLink11Description=https://datasheet.ciiva.com/1012/l0110s0100blm18a-1012013.pdf?src-supplier=Digi-Key, ComponentLink11URL=https://datasheet.ciiva.com/1012/l0110s0100blm18a-1012013.pdf?src-supplier=Digi-Key, ComponentLink12Description=https://datasheet.ciiva.com/16215/l0110s0100blm18a-16215230.pdf?src-supplier=Future+Electronics, ComponentLink12URL=https://datasheet.ciiva.com/16215/l0110s0100blm18a-16215230.pdf?src-supplier=Future+Electronics, Core Material=Ferrite, DC Current=500mA, DC Resistance-Max=180mR, Depth=0.8mm, Height=0.8mm, Impedance=120R, Lead Free="Lead Free", Length=1.6mm, Manufacturer Part Number=BLM18AG121SN1D, Material=Steel,Ferrite, Max Current Rating=500mA, Max DC Current=500mA, Military Standard=Not, Number of Circuits=1, Number of Lines=1, Number of Pins=2, Packaging="Tape and Reel", Pricing 1="1=0.10000, 10=0.07900, 25=0.07200, 50=0.06480, 100=0.04760, 250=0.03460, 500=0.03170, 1000=0.02738 (USD)", Radiation Hardening=No, REACH SVHC="No SVHC", RoHS=Yes, RoHS Compliant=Yes, Series=BLM18A, Shielding=Unshielded, Stock 1=1660, Supplier 1=Digi-Key, Termination=SMD/SMT, Test Frequency=100MHz, Width=0.8mm
L16: library part HLC021R6BTTR, "FIXED IND 1.6NH 660MA 150 MOHM", Case Code (Imperial)=0402, Case Code (Metric)=1005, Current Rating=660mA, DC Resistance (DCR)=150mR, Manufacturer="Kyocera AVX", Max Operating Temperature=125°C, Min Operating Temperature=-55°C, Package Quantity=5000, Self Resonant Frequency=18GHz, Supplier Part Number 1=478-HLC021R6BTCT-ND, Test Frequency=450MHz, Case/Package=0402, ComponentLink1Description=https://media.digikey.com/pdf/Data%20Sheets/AVX%20PDFs/MLO%20High%20Current%20Inductors.pdf?src-supplier=Digi-Key, ComponentLink1URL=https://media.digikey.com/pdf/Data%20Sheets/AVX%20PDFs/MLO%20High%20Current%20Inductors.pdf?src-supplier=Digi-Key, ComponentLink2Description=http://www.avx.com/docs/catalogs/mlohighcurrentinductor.pdf?src-supplier=Future+Electronics, ComponentLink2URL=http://www.avx.com/docs/catalogs/mlohighcurrentinductor.pdf?src-supplier=Future+Electronics, Core Material=Non-Magnetic, Depth=0.66mm, Height=0.35mm, Height - Seated (Max)=0.018inch, Inductance=1.6nH, Lead Free="Lead Free", Length=1mm, Manufacturer Part Number=HLC021R6BTTR, Max DC Current=660mA, Mount="Surface Mount", Packaging="Tape and Reel", Pricing 1="1=0.41, 10=0.36, 25=0.3152, 50=0.2704, 100=0.2478, 250=0.22524, 500=0.21174, 1000=0.16218, 2500=0.15317 (USD)", Q Factor=25, Radiation Hardening=No, REACH SVHC="No SVHC", Shielding=Unshielded, Stock 1=5000, Supplier 1=Digi-Key, Termination=SMD/SMT, Width=0.023inch
P1: library part "Header 1x4", "CONN HEADER VERT 4POS 2.54MM", Color=Black, Manufacturer="Wurth Electronics", Supplier Part Number 1=732-5317-ND, ComponentLink1Description=http://www.farnell.com/cad/1737268.pdf?src-supplier=Element14, ComponentLink1URL=http://www.farnell.com/cad/1737268.pdf?src-supplier=Element14, ComponentLink2Description=https://katalog.we-online.de/em/datasheet/6130xx11121.pdf?src-supplier=Digi-Key, ComponentLink2URL=https://katalog.we-online.de/em/datasheet/6130xx11121.pdf?src-supplier=Digi-Key, Connector Type="Male Pin", Contact Material=Copper, Contact Mating Length=0.236inch, Contact Plating=Gold, Gender=Male, Lead Free="Lead Free", Manufacturer Part Number=61300411121, Mount="Through Hole", Number of Contacts=4, Number of Positions=4, Number of Rows=1, Packaging=Bulk, Pitch=0.1inch, Pricing 1="1=0.18, 10=0.153, 25=0.1272, 50=0.106, 100=0.096, 1000=0.088 (USD)", REACH SVHC=Unknown, Stock 1=20544, Supplier 1=Digi-Key, Termination=Solder
P3 P4 P5 P6: library part "TEST POINT", "Test Point ON"
Q1: "SOT-23-3L MOSFETs RoHS", Manufacturer="STANSON Tech.", Package=SOT-23-3, ComponentLink1Description="Supplier Link", ComponentLink1URL=https://lcsc.com/product-detail/MOSFETs_STANSON-Tech-ST3422A_C2682907.html, Manufacturer Part No=ST3422A
R1: library part RC0201FR-07180KL, "RES SMD 180K OHM 1% 1/20W 0201", Case Code (Imperial)=0201, Case Code (Metric)=0603, Manufacturer=Yageo, Max Operating Temperature=125°C, Max Power Dissipation=50mW, Min Operating Temperature=-55°C, Resistance=180kR, Resistance Tolerance=1%, Resistor Type="Thick Film", Supplier Part Number 1=YAG2449CT-ND, Temperature Coefficient=200ppm/°C, Voltage Rating=25V, Case/Package=0201, Category="Chip SMD Resistors", ComponentLink1Description=https://datasheet.ciiva.com/22735/1563626-22735431.pdf?src-supplier=Element14, ComponentLink1URL=https://datasheet.ciiva.com/22735/1563626-22735431.pdf?src-supplier=Element14, ComponentLink2Description=https://datasheet.ciiva.com/6001/1563626-6001205.pdf?src-supplier=Farnell, ComponentLink2URL=https://datasheet.ciiva.com/6001/1563626-6001205.pdf?src-supplier=Farnell, ComponentLink3Description=https://datasheet.ciiva.com/22661/1563626-22661289.pdf?src-supplier=Element14, ComponentLink3URL=https://datasheet.ciiva.com/22661/1563626-22661289.pdf?src-supplier=Element14, Construction=Rectangular, Depth=0.3mm, Features="Moisture Resistant", Height=0.01inch, Lead Free="Lead Free", Length=0.6mm, Manufacturer Part Number=RC0201FR-07180KL, Military Standard=Not, Number of Terminations=2, Packaging="Tape and Reel", Power Rating=50mW, Pricing 1="1=0.10000, 10=0.04200, 100=0.01700, 1000=0.00765, 2500=0.00664, 5000=0.00548 (USD)", REACH SVHC=Unknown, RoHS=Yes, RoHS Compliant=Yes, Series=RC, Size Code=0201, Stock 1=75612, Supplier 1=Digi-Key, Termination=SMD/SMT, Tolerance=1%, Width=0.012inch
R2: library part RC0201FR-0720KL, "RES SMD 20K OHM 1% 1/20W 0201", Case Code (Imperial)=0201, Case Code (Metric)=0603, Manufacturer=Yageo, Max Operating Temperature=125°C, Max Power Dissipation=50mW, Min Operating Temperature=-55°C, Package Quantity=10000, Resistance=20kR, Resistor Type="Thick Film", Temperature Coefficient=200ppm/°C, Tolerance=1%, Voltage Rating=25V, Case/Package=0201, Category="Chip SMD Resistors", ComponentLink1Description=https://datasheet.ciiva.com/14985/pyu-r-int-thick-7-14985446.pdf?src-supplier=Digi-Key, ComponentLink1URL=https://datasheet.ciiva.com/14985/pyu-r-int-thick-7-14985446.pdf?src-supplier=Digi-Key, Construction=Rectangular, Depth=0.3mm, Features="Moisture Resistant", Height=0.01inch, Lead Free="Lead Free", Length=0.024inch, Manufacturer Part Number=RC0201FR-0720KL, Military Standard=Not, Number of Terminations=2, Packaging="Tape and Reel", Power Rating=50mW, Pricing 1="10000=0.00135, 20000=0.00133, 40000=0.00129, 60000=0.00126, 80000=0.00122, 100000=0.00119, 1000000=0.00116 (USD)", RoHS=Yes, RoHS Compliant=Yes, Series=RC, Size Code=0201, Stock 1=60000, Supplier 1=Avnet, Supplier Part Number 1=RC0201FR-0720KL, Termination=SMD/SMT, Width=0.012inch
R3 R6: library part CRCW08051K00JNEB, "RES SMD 1K OHM 5% 1/8W 0805", Case Code (Imperial)=0805, Case Code (Metric)=2012, Manufacturer="Vishay Dale", Max Operating Temperature=155°C, Max Power Dissipation=125mW, Min Operating Temperature=-55°C, Package Quantity=10000, Resistance=1kR, Resistor Type="Thick Film", Supplier Part Number 1=541-CRCW08051K00JNEBCT-ND, Temperature Coefficient=200ppm/°C, Tolerance=5%, Voltage Rating=150V, Case/Package=0805, Category="Chip SMD Resistors", ComponentLink1Description=https://datasheet.ciiva.com/5548/dcrcwe3-109170-5548326.pdf?src-supplier=Mouser, ComponentLink1URL=https://datasheet.ciiva.com/5548/dcrcwe3-109170-5548326.pdf?src-supplier=Mouser, ComponentLink2Description=https://datasheet.ciiva.com/28621/1747939-28621434.pdf?src-supplier=Element14, ComponentLink2URL=https://datasheet.ciiva.com/28621/1747939-28621434.pdf?src-supplier=Element14, Contact Plating=Tin, Features="Automotive AEC-Q200", Height=0.02inch, Lead Free="Lead Free", Length=0.079inch, Manufacturer Part Number=CRCW08051K00JNEB, Number of Pins=2, Number of Terminations=2, Packaging="Tape and Reel", Power Rating=125mW, Pricing 1="1=0.10000, 10=0.05000, 100=0.02040, 1000=0.00914, 2500=0.00794, 5000=0.00656 (USD)", Radiation Hardening=No, REACH SVHC=Unknown, RoHS=Yes, Stock 1=4389, Supplier 1=Digi-Key, Termination=SMD/SMT, Voltage Rating (DC)=150V, Weight=0.000194oz, Width=0.049inch
R4 R5: library part RMCF0805FT10K0, "RES 10K OHM 1% 1/8W 0805", Case Code (Imperial)=0805, Case Code (Metric)=2012, Manufacturer="Stackpole Electronics", Max Operating Temperature=155°C, Max Power Dissipation=125mW, Min Operating Temperature=-55°C, Resistance=10kR, Resistor Type="Thick Film", Supplier Part Number 1=RMCF0805FT10K0CT-ND, Temperature Coefficient=100ppm/°C, Tolerance=1%, Case/Package=0805, Category="Chip SMD Resistors", ComponentLink1Description=https://datasheet.ciiva.com/15193/getdatasheetpartid-362046-15193525.pdf?src-supplier=Verical, ComponentLink1URL=https://datasheet.ciiva.com/15193/getdatasheetpartid-362046-15193525.pdf?src-supplier=Verical, Construction=Rectangular, Contact Plating=Tin,Matte, Depth=1.25mm, Features="Automotive AEC-Q200", Height=0.026inch, Lead Free="Lead Free", Length=2mm, Manufacturer Part Number=RMCF0805FT10K0, Military Standard=Not, Mount="Surface Mount", Number of Terminations=2, Packaging="Tape and Reel", Power Rating=125mW, Pricing 1="1=0.10000, 10=0.02700, 100=0.01090, 1000=0.00488, 2500=0.00423 (USD)", Radiation Hardening=No, RoHS=Yes, RoHS Compliant=Yes, Series=RMCF, Size Code=0805, Stock 1=308321, Supplier 1=Digi-Key, Width=0.049inch